# Altium PCB AT-kdFCU.PcbDoc (part 2 of 2)
Units mm, origin at the board's own origin, x right, y up, seen from the top; angles counter-clockwise.
Board outline 40 x 40 mm, 4 copper layers (Top Layer, GND, POWER, Bottom Layer), stack 0.603 mm thick; 137 components, 117 nets, 527 pads, 186 vias.
Unrouted connection lines stored in the file: 1.
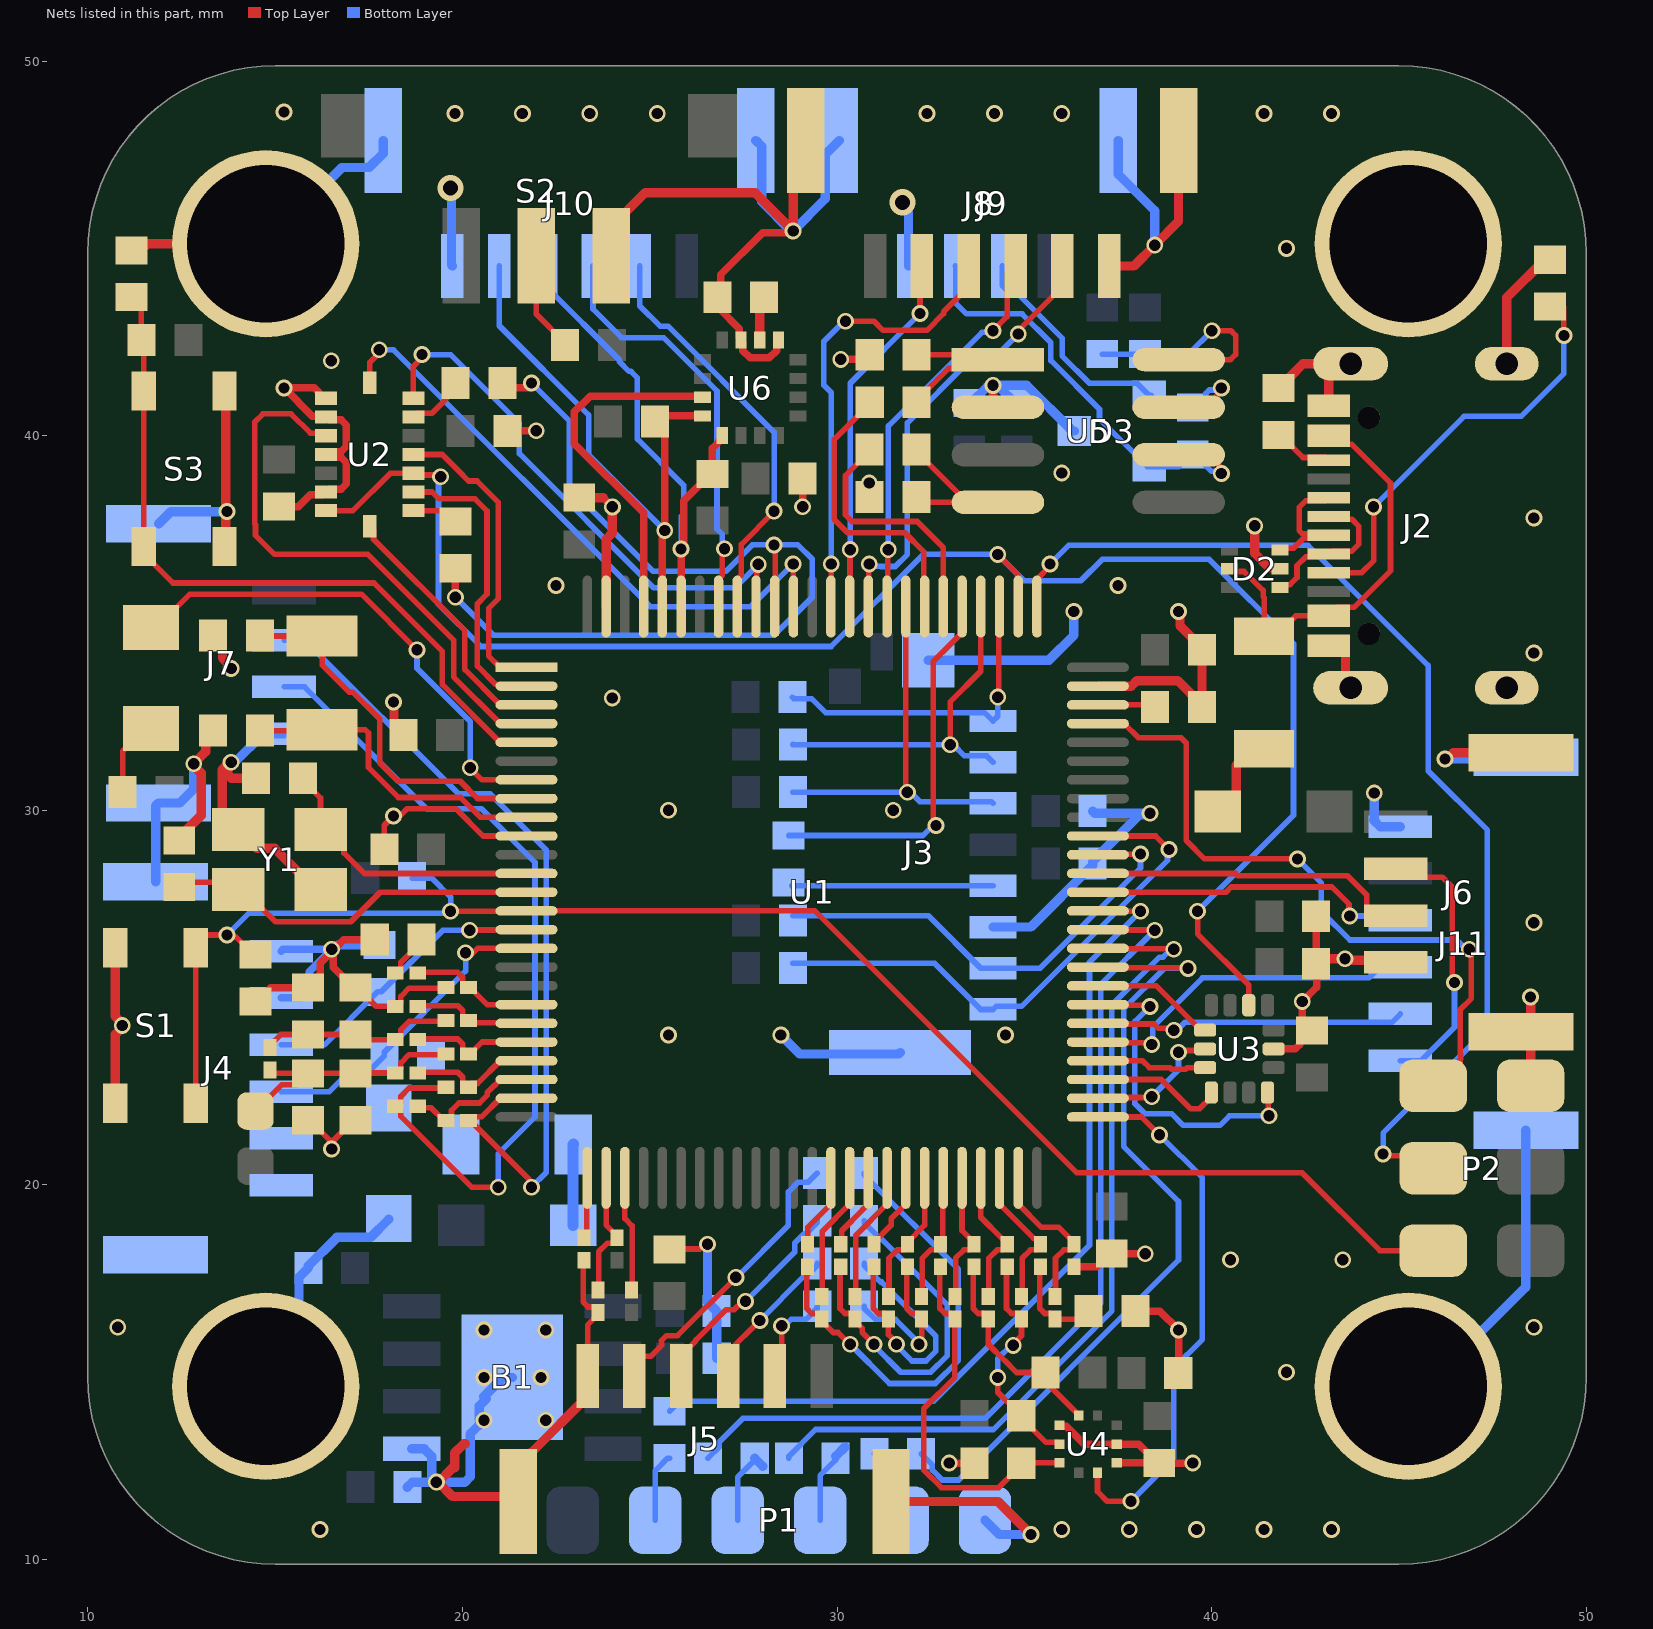
[diagram p4: the nets of this part, all layers, seen from the top]

## Via types
v1: diameter 0.45, hole 0.3, Top Layer to Bottom Layer, 180 vias
v2: diameter 0.7, hole 0.4, Top Layer to Bottom Layer, 6 vias

## Nets (pads, with @x,y where several pads share a name; then routed paths per layer and width w, separated by ;. In a path a pad name is that pad's centre, name@x,y a point inside that pad or via, vN(x,y) a via of type N, cw(c..) or ccw(c..) an arc to the next point about the centre after c; other vN are vias at no path point) (continued)
GND: B1.1 B1.9 C1.1 C2.1 C3.1 C4.1 C5.1 C6.1 C7.1 C8.1 C9.1 C10.1 C11.1 C12.1 C13.1 C14.2 C15.2 C16.1 C17.2 C18.2 C19.1 C20.1 C21.1 C22.1 C23.1 C24.1 C25.1 C26.2 C27.2 C28.1 C29.1 C30.1 C31.2 C32.1 C33.1 C34.1 C35.2 C36.2 C37.2 C38.2 C39.2 C40.1 D2.2 D3.3 D5.1 J2.A1_B12 J2.B1_A12 J2.S1 J2.S2 J2.S3 J2.S4 J3.6 J3.S1 J3.S2 J4.1 J4.2 J4.S1 J4.S2 J5.6 J5.S1 J5.S2 J6.4 J6.S1 J6.S2 J7.4 J7.S1 J7.S2 J8.4 J8.S1 J8.S2 J9.6 J9.S1 J9.S2 J10.6 J10.S1 J10.S2 J11.6 J11.S1 J11.S2 P1.1 P2.6 pad.2 R3.1 R4.1 R9.2 R40.1 R41.1 R50.1 R51.1 R72.1 S1.3 S1.4 S2.3 S3.3 S3.4 U1.10 U1.74 U1.99 U2.2 U2.4 U2.6 U2.7 U3.6 U4.3 U4.8 U4.9 U5.2 U6.9 U6.11 Y1.2 Y1.4 | length 205.7
  Top Layer w0.15: C3.1@15.88,21.725 15.93,21.725 16.453,21.203 16.453,21.012 v1(16.51,20.955) 16.567,21.012 16.567,21.193 17.1,21.725 C4.1@17.15,21.725 ; C6.1@17.15,25.265 17.2,25.265 17.7,24.765 R41.1@18.207,24.765 18.257,24.765 18.357,24.865 18.357,25.033 18.578,25.254 19.539,25.254 R40.1@19.558,25.273 ; C13.1@17.915,28.961 17.915,29.599 v1(18.161,29.845) ; v1@18.288,29.845 18.33,29.845 18.526,30.041 19.827,30.041 20.555,29.313 U1.10@21.712,29.313 ; R50.1@23.241,17.988 23.222,17.969 23.222,16.873 23.354,16.741 23.522,16.741 23.622,16.641 R51.1@23.622,16.591 23.622,16.541 23.341,16.26 J5.6@23.341,14.986 ; C10.1@25.532,18.28 25.541,18.288 26.335,18.288 26.462,18.415 v1(26.543,18.415)
  Top Layer w0.2: C16.1@14.473,24.9 14.523,24.9 14.887,25.265 C5.1@15.88,25.265 15.93,25.265 16.205,25.54 16.205,25.917 16.51,26.221 v1(16.51,26.289) ; C19.1@15.108,38.108 15.116,38.1 15.621,38.1 15.943,38.422 16.286,38.422 U2.2@16.361,38.497 16.436,38.572 16.76,38.572 16.906,38.718 16.906,39.276 16.76,39.422 16.436,39.422 U2.4@16.361,39.497 16.436,39.572 16.76,39.572 16.906,39.718 16.906,40.276 16.76,40.422 16.436,40.422 U2.6@16.361,40.497 16.336,40.522 15.993,40.522 v1(15.24,41.275) 16.049,41.275 16.166,41.158 16.166,41.072 16.241,40.997 U2.7@16.361,40.997 ; v1@16.558,26.241 16.558,25.807 17.1,25.265 C6.1@17.15,25.265 ; v1@16.578,26.289 16.837,26.548 C40.1@17.661,26.548 ; C25.1@21.201,40.127 21.206,40.132 v1(21.971,40.132) ; 23.757,38.346 v1(24.003,38.1) ; C32.1@26.551,43.693 26.551,43.643 26.826,43.368 26.876,43.368 27.386,42.859 27.386,42.6 U6.11@27.436,42.55 27.486,42.5 27.486,42.271 27.682,42.075 28.19,42.075 28.386,42.271 28.386,42.5 U6.9@28.436,42.55 ; C32.1@26.805,43.693 26.902,43.79 26.902,44.301 28.019,45.418 28.781,45.418 v1(28.829,45.466) ; C30.1@29.075,38.857 29.082,38.849 v1(29.082,38.101) ; v1(30.099,42.037) 30.751,42.037 C28.1@30.875,42.161 ; v1(32.996,12.573) 33.661,12.573 R9.2@33.667,12.568 ; U4.3@35.94,13.581 35.966,13.556 36.124,13.556 36.599,13.081 U4.9@37.466,13.081 38.053,13.081 38.553,12.581 C24.1@38.603,12.581 38.611,12.573 v1(39.497,12.573) ; R72.1@36.322,17.815 36.928,17.815 37.283,18.169 C9.1@37.333,18.169 37.341,18.161 v1(38.227,18.161) ; U4.8@37.466,12.581 C24.1@38.603,12.581 ; C2.1@37.965,16.632 38.613,16.632 v1(39.116,16.129) 39.116,14.989 C23.1@39.108,14.981 C23.1@39.108,14.727 ; U3.6@41.656,23.63 42.235,23.63 42.352,23.747 42.352,23.847 42.627,24.122 C21.1@42.677,24.122 42.418,24.381 v1(42.418,24.892) 42.799,25.273 42.799,25.894 C20.1@42.791,25.903 C22.1@42.791,27.173
  Top Layer w0.25: S1.4@10.736,22.182 10.736,24.017 10.922,24.203 v1(10.922,24.257) 10.922,24.311 10.736,24.497 S1.3@10.736,26.332 ; C31.2@11.425,44.946 11.601,45.123 pad.2@14.75,45.123 ; C14.2@12.441,29.325 12.491,29.325 13.025,29.859 13.025,30.996 12.827,31.193 v1(12.827,31.242) 13.15,31.565 13.15,31.929 C15.2@13.347,32.126 ; C18.2@13.347,34.666 13.597,34.416 13.597,34.066 13.827,33.836 v1(13.827,33.782) ; S3.3@13.648,37.041 13.682,37.075 13.682,37.939 v1(13.716,37.973) 13.682,38.007 13.682,41.157 S3.4@13.648,41.191 ; 13.74,31.037 13.74,30.944 13.828,30.856 C17.2@14.49,30.856 ; v1(13.827,31.28) 13.783,31.28 13.589,31.086 13.589,29.906 Y1.4@14.013,29.482 14.513,28.982 14.988,28.982 Y1.2@16.088,27.882 ; v1(18.161,32.893) 18.173,32.881 18.173,32.259 C7.1@18.423,32.009 ; v1(19.304,12.065) v1@19.358,12.065 ; 20.071,13.093 20.043,13.093 19.793,12.843 19.793,12.446 19.739,12.446 v1@19.358,12.065 ; C12.1@23.119,38.346 23.757,38.346 ; J5.6@23.341,14.9 23.341,14.35 21.866,12.875 21.866,12.107 21.443,11.684 19.739,11.684 v1@19.358,12.065 ; U1.99@23.837,35.438 23.837,37.232 24.003,37.398 v1(24.003,38.1) ; S2.3@23.971,44.8 23.971,45.575 24.878,46.482 27.813,46.482 v1(28.829,45.466) 28.829,47.542 J9.S2@29.166,47.879 ; v1(30.861,38.735) 30.861,38.368 C29.1@30.869,38.359 ; J5.S2@31.441,11.55 34.297,11.55 v1(35.179,10.668) ; v1(34.163,41.343) 34.163,40.89 U5.2@34.295,40.759 ; U1.74@36.963,33.313 37.856,33.313 38.004,33.461 39.093,33.461 C1.1@39.743,32.811 ; J9.6@37.266,44.529 37.925,44.529 v1(38.481,45.085) 39.116,45.72 J9.S1@39.116,47.879 ; v1(39.116,35.306) 39.154,35.268 39.154,34.923 39.743,34.335 C11.1@39.743,34.285 C1.1@39.743,32.811 ; C1.1@39.743,32.761 C1.1@39.743,32.811 ; v1(41.148,37.592) 41.148,36.86 41.534,36.474 41.798,36.474 D2.2@41.823,36.449 ; R4.1@41.788,41.267 41.838,41.267 42.088,41.517 42.088,41.567 42.439,41.917 J2.S2@43.429,41.917 ; C20.1@42.799,25.894 42.94,26.035 v1(43.561,26.035) 43.599,25.997 44.851,25.997 J6.4@44.91,25.938 ; J2.A1_B12@43.129,34.392 43.399,34.392 43.574,34.217 43.574,33.402 J2.S1@43.709,33.267 ; J2.B1_A12@43.129,40.792 43.129,41.617 J2.S2@43.429,41.917 ; J2.S2@43.709,41.917 J2.S2@43.429,41.917 ; pad.2@45.212,14.732 pad.2@45.287,14.807 ; v1(46.228,31.369) 46.282,31.369 46.451,31.538 J6.S2@48.26,31.538 ; J2.S4@47.879,41.917 47.879,43.688 R3.1@48.895,44.704 ; v1(48.514,25.019) 48.514,22.707 P2.6@48.574,22.647
  Bottom Layer w0.15: D5.1@18.034,19.084 D5.1@18.034,19.099 D5.1@18.034,19.114
  Bottom Layer w0.2: J4.2@15.161,24.989 15.711,24.989 15.911,25.189 15.911,25.69 v1(16.51,26.289) 15.211,26.289 J4.1@15.161,26.239
  Bottom Layer w0.25: J4.S2@11.811,28.089 11.811,30.115 J7.S1@11.89,30.194 12.452,30.194 12.827,30.569 v1(12.827,31.242) ; J7.S2@11.89,37.644 12.219,37.973 v1(13.716,37.973) ; v1(13.827,31.28) 13.926,31.28 14.69,32.044 J7.4@15.24,32.044 ; pad.2@14.75,14.623 15.637,15.51 15.637,17.535 C38.2@15.887,17.785 15.887,17.835 16.65,18.599 17.549,18.599 D5.1@18.034,19.084 ; pad.2@14.75,45.123 16.783,47.156 17.51,47.156 17.885,47.531 J10.S1@17.885,47.879 ; v1(16.51,26.289) 16.564,26.289 16.679,26.404 C35.2@17.785,26.404 ; C39.2@18.53,11.933 18.663,12.065 v1(19.304,12.065) ; B1.1@18.648,12.954 18.977,12.954 19.177,12.754 19.177,12.192 v1(19.304,12.065) ; v2(19.685,46.609) 19.71,46.584 19.71,44.554 J10.6@19.735,44.529 ; B1.9@20.447,13.716 20.447,14.097 B1.9@20.637,14.287 ; v1(20.574,13.716) 20.212,13.354 20.212,12.211 20.066,12.065 v1(19.304,12.065) ; B1.9@20.574,14.351 21.082,14.859 B1.9@21.336,14.859 ; v1(26.543,18.415) 26.543,16.874 C37.2@26.785,16.632 26.789,16.628 C8.1@26.789,15.372 ; J10.S2@27.835,47.879 27.99,47.724 27.99,46.25 28.775,45.466 v1(28.829,45.466) 29.684,46.321 29.684,47.506 J8.S1@30.057,47.879 ; v1(28.5,24) 29.005,23.495 31.645,23.495 J3.S1@31.683,23.533 ; v2(31.75,46.228) 31.75,46.106 31.907,45.949 J8.4@31.907,44.529 ; J3.S2@32.438,34.008 35.659,34.008 36.322,34.671 v1(36.322,35.306) ; C26.2@33.528,40.874 33.578,40.874 34.008,41.304 34.125,41.304 v1(34.163,41.343) ; P1.1@33.95,11.049 34.331,10.668 v1(35.179,10.668) ; J3.6@34.163,26.883 35.174,26.883 36.822,28.53 C34.1@36.822,28.58 36.822,28.63 38.072,29.881 38.316,29.881 v1(38.354,29.919) 36.88,29.919 C33.1@36.822,29.977 ; C27.2@34.798,40.874 34.748,40.874 34.318,41.304 34.201,41.304 v1(34.163,41.343) ; D3.3@36.333,40.124 36.283,40.124 35.064,41.343 v1(34.163,41.343) ; J8.S2@37.507,47.879 37.507,46.979 38.481,46.005 v1(38.481,45.085) ; v1(44.342,30.461) 44.342,29.738 44.323,29.738 44.498,29.563 J11.6@45.037,29.563 ; pad.2@45.212,14.732 45.847,14.732 48.387,17.272 J11.S2@48.387,21.463 ; v1(46.228,31.369) 48.343,31.369 J11.S1@48.387,31.413
  other v1: 16.2,10.8 36,10.8 37.8,10.8 39.6,10.8 41.4,10.8 43.2,10.8 22.225,13.716 20.574,14.859 22.098,14.859 42,15 20.574,16.129 22.225,16.129 10.8,16.2 48.6,16.2 40.5,18 43.5,18 25.5,24 34.5,24 48.6,27 25.5,30 31.5,30 24,33 48.6,34.2 22.5,36 37.5,36 48.6,37.8 36,39 16.5,42 42,45 19.8,48.6 21.6,48.6 23.4,48.6 25.2,48.6 32.4,48.6 34.2,48.6 36,48.6 41.4,48.6 43.2,48.6 15.24,48.641
NetC2_2: C2.2 R70.1 R71.1 | length 2.7
  Top Layer w0.15: R70.1@35.434,17.814 35.415,17.795 35.415,17.338 35.414,17.336 35.414,16.7 35.546,16.568 35.714,16.568 35.814,16.468 R71.1@35.814,16.418 36.501,16.418 C2.2@36.715,16.632
NetC3_2: C3.2 C4.2 FB1.2 R42.1 R45.1 R46.1 | length 6.9
  Top Layer w0.15: FB1.2@14.478,21.971 15.182,22.675 15.58,22.675 C3.2@15.88,22.975 ; R42.1@14.859,23.068 14.952,22.975 C3.2@15.88,22.975 ; R45.1@19.558,23.495 19.539,23.476 18.578,23.476 18.357,23.255 18.357,23.087 18.257,22.987 R46.1@18.207,22.987 17.162,22.987 C4.2@17.15,22.975 C3.2@15.88,22.975
NetC5_2: C5.2 C6.2 R42.2 R43.1 R44.1 | length 5.2
  Top Layer w0.15: R42.2@14.859,23.668 14.859,23.718 15.156,24.015 C5.2@15.88,24.015 C6.2@17.15,24.015 17.289,23.876 R44.1@18.207,23.876 18.257,23.876 18.357,23.976 18.357,24.144 18.578,24.365 19.539,24.365 R43.1@19.558,24.384
NetC28_2: C28.2 R13.2 U5.1 | length 4.9
  Top Layer w0.15: R13.2@32.125,40.891 32.125,40.941 32.976,41.793 34.059,41.793 U5.1@34.295,42.029 34.162,42.161 C28.2@32.125,42.161
NetC29_2: C29.2 R15.2 U5.4 | length 3.4
  Top Layer w0.15: C29.2@32.119,38.359 32.26,38.219 33.48,38.219 32.119,39.579 R15.2@32.119,39.629
NetC31_1: C31.1 R12.1 S3.1 S3.2 U1.5 | length 19.7
  Top Layer w0.15: C31.1@11.425,43.696 11.425,42.564 R12.1@11.438,42.55 11.498,42.491 S3.2@11.498,41.191 S3.1@11.498,37.041 11.498,36.841 12.271,36.068 17.639,36.068 19.466,34.241 19.466,33.357 21.01,31.813 U1.5@21.712,31.813
NetC32_2: C32.2 U6.10 | length 1.3
  Top Layer w0.25: C32.2@27.801,43.82 27.936,43.686 U6.10@27.936,42.55
NetC35_1: C35.1 J4.3 U1.15 | length 7.8
  Top Layer w0.15: v1(20.193,26.797) 20.201,26.805 21.704,26.805 U1.15@21.712,26.813
  Bottom Layer w0.15: J4.3@15.161,23.739 16.32,23.739 17.735,25.154 C35.1@17.785,25.154 17.835,25.154 19.478,26.797 v1(20.193,26.797)
NetC36_1: C36.1 J4.4 U1.16 | length 8.5
  Top Layer w0.15: v1@20.085,26.072 20.166,26.072 20.408,26.313 U1.16@21.712,26.313
  Bottom Layer w0.15: J4.4@15.161,22.489 16.45,22.489 17.101,23.14 17.615,23.14 17.915,23.44 C36.1@17.915,23.49 17.915,23.54 20.085,25.71 v1(20.085,26.199)
NetC40_2: C40.2 R39.1 | length 1.2
  Top Layer w0.15: R39.1@18.207,25.654 18.257,25.654 18.357,25.754 18.357,25.944 18.911,26.498 C40.2@18.911,26.548
NetD1_A: D1.A F1.2 | length 2.5
  Top Layer w0.25: D1.A@40.166,29.845 40.226,29.845 40.661,30.28 40.661,31.206 41.102,31.647 F1.2@41.402,31.647
NetD2_1: D2.1 J2.A7 J2.B7 | length 4.2
  Top Layer w0.15: D2.1@41.823,35.949 41.898,36.024 42.091,36.024 42.279,36.211 42.279,36.53 42.516,36.767 43.054,36.767 J2.B7@43.129,36.842 43.204,36.917 43.742,36.917 43.924,37.099 43.924,37.585 43.742,37.767 43.204,37.767 J2.A7@43.129,37.842
NetD2_3: D2.3 J2.A6 J2.B6 | length 3.8
  Top Layer w0.15: D2.3@41.823,36.949 41.87,36.996 42.189,36.996 42.46,37.267 43.054,37.267 J2.A6@43.129,37.342 43.094,37.377 42.425,37.377 42.334,37.468 42.334,38.085 42.516,38.267 43.054,38.267 J2.B6@43.129,38.342
NetD2_5: D2.5 F1.1 J2.A4_B9 J2.B4_A9 | length 10.9
  Top Layer w0.15: D2.5@40.6,36.449 40.675,36.374 40.868,36.374 41.373,35.869 41.373,35.706 41.402,35.677 F1.1@41.402,34.647 41.702,34.647 42.247,35.192 J2.A4_B9@43.129,35.192 43.354,35.417 43.8,35.417 44.773,36.39 44.773,38.736 43.742,39.767 43.354,39.767 J2.B4_A9@43.129,39.992
NetD3_1: D3.1 J8.2 R14.2 U5.7 | length 9.8
  Top Layer w0.15: U5.7@39.122,40.759 40.021,40.759 40.136,40.873 40.136,41.07 40.259,41.194 v1(40.259,41.275)
  Bottom Layer w0.15: J8.2@34.407,44.529 34.407,44.008 34.632,43.783 34.83,43.783 36.009,42.604 36.009,42.128 36.738,41.399 38.008,41.399 D3.1@38.333,41.074 38.383,41.074 38.709,40.747 39.547,40.747 39.847,41.047 39.847,41.13 39.935,41.218 40.202,41.218 v1(40.259,41.275)
NetD3_2: D3.2 J8.3 R14.1 U5.6 | length 12.1
  Top Layer w0.15: U5.6@39.122,39.489 39.918,39.489 40.202,39.205 40.202,39.046 v1(40.259,38.989)
  Bottom Layer w0.15: J8.3@33.157,44.529 33.166,44.52 33.166,43.542 33.459,43.249 34.94,43.249 35.709,42.48 35.709,42.003 37.008,40.704 37.008,40.449 38.283,39.174 39.124,39.174 39.447,39.497 R14.1@39.497,39.497 39.547,39.497 39.998,39.046 40.202,39.046 v1(40.259,38.989)
NetD4_A: D4.A F2.2 | length 2.2
  Bottom Layer w0.3: D4.A@22.953,18.923 22.953,21.072 F2.2@22.963,21.082
NetD5_2: D5.2 F2.1 J4.5 J4.6
NetDS1_1: DS1.1 R16.1 | length 2.1
  Top Layer w0.15: R16.1@10.93,30.485 10.93,31.574 11.534,32.178 DS1.1@11.684,32.178
NetDS1_2: DS1.2 U1.7 | length 13.5
  Top Layer w0.15: DS1.2@11.684,34.878 11.834,34.878 12.724,35.768 17.303,35.768 v1(18.788,34.282) ; v1(20.209,31.137) 20.209,31.131 20.527,30.813 U1.7@21.712,30.813
  Bottom Layer w0.15: v1(18.788,34.282) 18.788,33.791 20.209,32.37 v1(20.209,31.137)
NetJ2_A5: J2.A5 R3.2 | length 11.3
  Top Layer w0.15: J2.A5@43.129,36.342 44.008,36.342 44.323,36.657 v1(44.323,38.1) ; R3.2@49.264,43.566 49.403,43.428 v1(49.403,42.672)
  Bottom Layer w0.15: v1(44.323,38.1) 46.736,40.513 48.26,40.513 49.403,41.656 v1(49.403,42.672)
NetJ2_B5: J2.B5 R4.2 | length 1.6
  Top Layer w0.15: R4.2@41.788,40.017 41.838,40.017 42.438,39.417 43.054,39.417 J2.B5@43.129,39.342
NetJ3_1: J3.1 R19.1 U1.78 | length 8.7
  Top Layer w0.15: v1(34.29,33.02) 34.317,33.047 34.317,35.419 U1.78@34.337,35.438
  Bottom Layer w0.15: R19.1@28.809,33.02 28.847,32.982 29.321,32.982 29.695,32.608 33.938,32.608 J3.1@34.163,32.383 34.29,32.51 v1(34.29,33.02)
NetJ3_2: J3.2 R20.1 U1.79 | length 9.6
  Top Layer w0.15: v1(33.02,31.75) 33.02,32.893 33.837,33.71 U1.79@33.837,35.438
  Bottom Layer w0.15: R20.1@28.821,31.755 28.826,31.75 v1(33.02,31.75) 33.101,31.75 33.401,31.45 33.996,31.45 J3.2@34.163,31.283
NetJ3_3: J3.3 R21.1 U1.83 | length 10.4
  Top Layer w0.15: U1.83@31.837,35.438 31.837,30.52 v1(31.877,30.48)
  Bottom Layer w0.15: R21.1@28.821,30.485 31.872,30.485 v1(31.877,30.48) 31.958,30.48 32.212,30.226 34.12,30.226 J3.3@34.163,30.183
NetJ3_5: J3.5 R24.1 | length 5.4
  Bottom Layer w0.15: R24.1@28.792,27.983 J3.5@34.163,27.983
NetJ3_7: J3.7 R22.1 U1.65 | length 12.5
  Top Layer w0.15: U1.65@36.962,28.813 36.971,28.821 38.091,28.821 v1(38.099,28.83)
  Bottom Layer w0.15: R22.1@28.821,27.183 32.438,27.183 33.838,25.783 J3.7@34.163,25.783 35.423,25.783 38.099,28.459 v1(38.099,28.83)
NetJ3_8: J3.8 R23.1 U1.66 | length 14.5
  Top Layer w0.15: U1.66@36.962,29.313 38.505,29.313 v1(38.862,28.956)
  Bottom Layer w0.15: R23.1@28.821,25.913 32.608,25.913 33.838,24.683 J3.8@34.163,24.683 34.245,24.765 34.925,24.765 38.821,28.661 38.821,28.915 v1(38.862,28.956)
NetJ5_2: J5.2 R38.1 | length 2.5
  Top Layer w0.15: J5.2@28.341,14.986 28.522,15.167 v1(28.522,16.237)
  Bottom Layer w0.15: v1(28.522,16.237) 28.603,16.237 28.775,16.409 29.172,16.409 29.472,16.709 R38.1@29.472,16.759
NetJ5_3: J5.3 R37.1 | length 3.9
  Top Layer w0.15: J5.3@27.091,14.986 27.091,15.536 27.938,16.383 v1(27.94,16.383)
  Bottom Layer w0.15: v1(27.94,16.383) 29.109,17.552 29.172,17.552 29.472,17.852 R37.1@29.472,17.902
NetJ5_4: J5.4 R36.1 | length 5.8
  Top Layer w0.15: J5.4@25.841,14.986 25.841,15.45 26.232,15.841 26.232,15.859 27.04,16.667 27.254,16.667 27.478,16.891 v1(27.559,16.891)
  Bottom Layer w0.15: v1(27.559,16.891) 28.872,18.204 28.872,18.445 29.122,18.695 29.172,18.695 29.472,18.995 R36.1@29.472,19.045
NetJ5_5: J5.5 R35.1 | length 7.8
  Top Layer w0.15: J5.5@24.591,14.986 24.591,15.198 24.816,15.423 25.028,15.423 25.316,15.711 25.316,15.843 25.448,15.975 25.741,15.975 v1(27.298,17.533)
  Bottom Layer w0.15: v1(27.298,17.533) 27.312,17.533 28.702,18.923 28.702,19.812 28.96,20.07 29.228,20.07 R35.1@29.472,20.315
NetJ6_2: J6.2 J11.1 | length 7.3
  Top Layer w0.15: J6.2@44.91,28.438 45.135,28.213 46.163,28.213 46.425,27.952 46.425,25.457 v1(46.482,25.4)
  Bottom Layer w0.15: J11.1@45.037,23.313 45.587,23.313 46.482,24.208 v1(46.482,25.4)
NetJ6_3: J6.3 U1.64 | length 8.6
  Top Layer w0.15: U1.64@36.962,28.313 40.639,28.313 40.7,28.252 43.628,28.252 44.135,27.745 44.135,27.413 44.36,27.188 J6.3@44.91,27.188
NetJ7_2: J7.2 R49.1 U1.24 | length 22.8
  Top Layer w0.15: R49.1@20.158,21.717 R49.1@20.193,21.717 ; U1.24@21.712,22.313 21.01,22.313 20.514,21.817 20.293,21.817 R49.1@20.193,21.717 ; v1(21.844,19.939) 21.787,19.996 21.787,20.138 20.208,21.717 R49.1@20.193,21.717
  Bottom Layer w0.15: J7.2@15.24,34.544 15.79,34.544 19.894,30.44 20.741,30.44 22.238,28.943 22.238,20.333 v1(21.844,19.939)
NetJ7_3: J7.3 R47.1 R48.1 | length 23.1
  Top Layer w0.15: R48.1@18.207,22.098 R48.1@18.257,22.098 ; R47.1@19.558,22.606 19.539,22.587 18.578,22.587 18.357,22.366 18.357,22.198 R48.1@18.257,22.098 ; v1(20.955,19.939) 20.248,19.939 18.357,21.83 18.357,21.998 R48.1@18.257,22.098
  Bottom Layer w0.15: J7.3@15.24,33.294 15.79,33.294 19.043,30.041 20.505,30.041 21.938,28.608 21.938,21.811 20.955,20.828 v1(20.955,19.939)
NetJ9_2: J9.2 U1.86 | length 9.9
  Top Layer w0.15: U1.86@30.337,35.438 30.345,35.446 30.345,36.949 v1(30.353,36.957) ; v1(32.214,43.261) 32.214,44.477 J9.2@32.266,44.529
  Bottom Layer w0.15: v1(30.353,36.957) 30.353,41.4 v1(32.214,43.261)
NetJ9_3: J9.3 U1.87 | length 12.4
  Top Layer w0.15: U1.87@29.837,35.438 29.841,35.442 29.841,36.572 v1(29.845,36.576) ; v1(30.226,43.053) 30.988,43.053 31.23,42.811 32.4,42.811 32.846,43.256 32.846,43.309 33.516,43.979 J9.3@33.516,44.529
  Bottom Layer w0.15: v1(29.845,36.576) 29.845,41.148 29.649,41.344 29.649,42.521 30.181,43.053 v1(30.226,43.053)
NetJ9_4: J9.4 U1.84 | length 10.7
  Top Layer w0.15: U1.84@31.337,35.438 31.353,35.454 31.353,36.941 v1(31.369,36.957) ; v1(34.163,42.799) 34.541,43.177 34.541,44.304 J9.4@34.766,44.529
  Bottom Layer w0.15: v1(31.369,36.957) 31.369,40.257 33.869,42.757 34.121,42.757 v1(34.163,42.799)
NetJ9_5: J9.5 U1.85 | length 12.1
  Top Layer w0.15: U1.85@30.837,35.438 30.849,35.45 30.849,36.564 v1(30.861,36.576) ; v1(34.838,42.715) 34.895,42.772 34.895,42.858 36.016,43.979 J9.5@36.016,44.529
  Bottom Layer w0.15: v1(30.861,36.576) 30.918,36.519 31.171,36.519 31.183,36.507 31.555,36.507 31.877,36.829 31.877,40.341 33.536,42 34.123,42 v1(34.838,42.715)
NetJ10_2: J10.2 U1.92 | length 11.1
  Top Layer w0.15: U1.92@27.337,35.438 27.337,36.168 27.447,36.277 27.447,37.099 28.321,37.973 v1(28.321,37.984)
  Bottom Layer w0.15: J10.2@24.735,44.529 24.735,43.464 25.283,42.916 25.497,42.916 28.321,40.092 v1(28.321,37.984)
NetJ10_3: J10.3 U1.93 | length 11.3
  Top Layer w0.15: U1.93@26.837,35.438 26.837,36.168 26.939,36.27 26.939,36.923 v1(26.997,36.981)
  Bottom Layer w0.15: J10.3@23.485,44.529 23.485,43.379 24.248,42.616 25.372,42.616 26.797,41.191 26.797,37.506 26.939,37.363 26.939,37.038 v1(26.997,36.981)
NetJ10_4: J10.4 R11.1 U1.95 U6.1 | length 14.2
  Top Layer w0.2: v1(25.834,36.976) 25.837,36.972 U1.95@25.837,35.438 ; v1@25.908,36.957 25.908,38.263 26.625,38.981 R11.1@26.675,38.981 26.675,39.664 26.936,39.925 U6.1@26.936,40
  Bottom Layer w0.15: J10.4@22.235,44.529 22.235,43.979 24.188,42.026 24.188,41.978 24.452,41.714 24.5,41.714 24.671,41.543 24.671,39.91 25.908,38.673 25.908,37.902 25.85,37.844 25.85,36.992 v1(25.834,36.976)
NetJ10_5: J10.5 R10.1 U1.96 U6.16 | length 15.3
  Top Layer w0.2: U1.96@25.337,35.438 25.337,37.334 25.4,37.397 v1(25.4,37.465) 25.4,40.118 R10.1@25.138,40.381 25.282,40.525 U6.16@26.411,40.525
  Bottom Layer w0.15: J10.5@20.985,44.529 20.985,42.933 23.368,40.55 23.368,39.497 v1(25.4,37.465)
NetJ11_2: J11.2 U1.56 | length 8.3
  Top Layer w0.15: U1.56@36.962,24.313 36.982,24.293 38.465,24.293 38.573,24.186 38.933,24.186 v1(38.99,24.129)
  Bottom Layer w0.15: v1(38.99,24.129) 39.072,24.129 39.281,24.338 44.812,24.338 J11.2@45.037,24.563
NetJ11_3: J11.3 U1.55 | length 9.2
  Top Layer w0.15: U1.55@36.962,23.813 36.982,23.793 v1@38.4,23.793
  Bottom Layer w0.15: v1(38.4,23.749) 38.424,23.773 38.424,24.199 39.752,25.527 44.201,25.527 44.487,25.813 J11.3@45.037,25.813
NetJ11_4: J11.4 U1.63 | length 8.7
  Top Layer w0.15: U1.63@36.962,27.813 40.381,27.813 40.52,27.952 43.21,27.952 43.666,27.496 43.666,27.197 v1(43.685,27.178)
  Bottom Layer w0.15: v1(43.685,27.178) 44.922,27.178 J11.4@45.037,27.063
NetP1_2: P1.2 R29.1 | length 2.1
  Bottom Layer w0.15: R29.1@30.996,12.822 31.296,12.522 31.296,11.503 P1.2@31.75,11.049
NetP1_3: P1.3 R32.1 | length 2.2
  Bottom Layer w0.15: P1.3@29.55,11.049 29.55,12.242 29.964,12.655 R32.1@29.964,12.705 R32.1@29.964,12.755
  Bottom Layer w0.25: R32.1@29.964,12.755 R32.1@30.214,13.005
NetP1_4: P1.4 R33.1 | length 2.1
  Bottom Layer w0.15: P1.4@27.35,11.049 27.35,12.201 27.805,12.655 R33.1@27.805,12.705
  Bottom Layer w0.25: R33.1@27.805,12.705 R33.1@28.019,12.491
NetP1_5: P1.5 R34.1 | length 1.8
  Bottom Layer w0.15: P1.5@25.15,11.049 25.15,12.376 25.482,12.708 R34.1@25.532,12.708
NetR2_1: R2.1 S2.2 | length 2.7
  Top Layer w0.15: S2.2@21.971,44.8 21.971,43.244 22.741,42.473 R2.1@22.741,42.423
NetR5_1: R5.1 R66.1 R67.1 U4.2 | length 6
  Top Layer w0.15: R66.1@33.655,17.815 33.636,17.796 33.636,16.7 33.768,16.568 33.936,16.568 34.036,16.468 R67.1@34.036,16.418 34.036,15.747 34.474,15.309 34.476,15.309 34.794,14.991 35.318,14.991 36.453,13.856 U4.2@36.453,13.844 ; R5.1@35.568,14.991 R5.1@35.868,14.691
NetR6_1: R6.1 R68.1 R69.1 U4.4 | length 6.2
  Top Layer w0.15: v1(34.29,14.859) 34.29,14.464 34.567,14.188 34.617,14.188 34.917,13.888 34.917,13.788 35.578,13.126 35.895,13.126 U4.4@35.94,13.081 ; R68.1@34.544,17.815 34.525,17.796 34.525,16.7 34.657,16.568 34.825,16.568 34.925,16.468 R69.1@34.925,16.418 34.925,15.974 34.702,15.752 v1(34.702,15.717)
  Bottom Layer w0.15: v1(34.29,14.859) 34.29,15.367 34.64,15.717 v1(34.702,15.717)
NetR7_1: R7.1 U2.15 | length 1.1
  Top Layer w0.15: U2.15@18.691,37.997 19.788,37.997 R7.1@19.812,37.973
NetR7_2: R7.2 R8.2 U1.90 | length 25.7
  Top Layer w0.15: v1(28.321,37.084) 28.347,37.058 28.347,35.448 U1.90@28.337,35.438
  Top Layer w0.2: v1(19.812,35.687) 19.812,36.455 R7.2@19.817,36.461 ; R8.2@21.07,41.28 21.076,41.275 v1@21.844,41.275
  Bottom Layer w0.15: v1(19.812,35.687) 20.828,34.671 28.321,34.671 29.337,35.687 29.337,36.703 28.956,37.084 v1(28.321,37.084) 27.736,37.084 27.032,36.38 25.087,36.38 22.859,38.608 22.859,40.387 v1(21.844,41.402)
NetR8_1: R8.1 U2.10 | length 1.5
  Top Layer w0.15: U2.10@18.691,40.497 18.791,40.597 19.187,40.597 19.82,41.23 R8.1@19.82,41.28
NetR9_1: R9.1 R64.1 R65.1 U4.5 | length 10.2
  Top Layer w0.15: R64.1@32.766,17.815 32.747,17.796 32.747,16.7 32.879,16.568 33.047,16.568 33.147,16.468 R65.1@33.147,16.418 33.147,14.86 32.316,14.029 32.316,12.387 32.785,11.918 34.317,11.918 34.917,12.518 R9.1@34.917,12.568 34.93,12.581 U4.5@35.94,12.581
NetR13_1: R13.1 U1.82 | length 7.7
  Top Layer w0.15: R13.1@30.875,40.891 30.875,40.841 29.926,39.892 29.926,37.76 30.279,37.407 31.808,37.407 32.317,36.898 32.317,35.458 U1.82@32.337,35.438
NetR15_1: R15.1 U1.81 | length 6.6
  Top Layer w0.15: R15.1@30.869,39.629 30.869,39.579 30.226,38.936 30.226,37.884 30.401,37.709 32.141,37.709 32.837,37.013 U1.81@32.837,35.438
NetR17_2: R17.2 R18.2 U5.8 | length 6
  Top Layer w0.15: U5.8@39.122,42.029 40.505,42.029 40.64,42.164 40.64,42.672 40.513,42.799 v1(40.005,42.799)
  Bottom Layer w0.15: R18.2@37.079,42.176 R17.2@38.222,42.176 39.382,42.176 v1(40.005,42.799)
NetR24_2: R24.2 U1.80 | length 10.2
  Top Layer w0.15: v1(32.639,29.591) 32.639,29.672 32.57,29.741 32.57,33.97 33.337,34.737 U1.80@33.337,35.438
  Bottom Layer w0.15: R24.2@28.707,29.325 32.292,29.325 32.558,29.591 v1(32.639,29.591)
NetR29_2: R29.2 U1.59 | length 21.6
  Top Layer w0.15: U1.59@36.962,25.813 36.978,25.797 39.354,25.797 v1(39.37,25.781)
  Bottom Layer w0.15: R29.2@32.246,12.822 32.546,12.522 32.546,12.387 32.81,12.123 33.248,12.123 39.116,17.991 39.116,19.558 37.65,21.024 37.65,24.697 38.734,25.781 v1(39.37,25.781)
NetR32_2: R32.2 U1.60 | length 22.8
  Top Layer w0.15: U1.60@36.962,26.313 36.974,26.301 38.977,26.301 v1(38.989,26.289)
  Bottom Layer w0.15: R32.2@28.714,12.705 28.714,12.755 29.43,13.472 34.173,13.472 37.338,16.637 37.338,24.81 38.609,26.081 38.7,26.081 38.908,26.289 v1(38.989,26.289)
NetR33_2: R33.2 U1.61 | length 24.4
  Top Layer w0.15: U1.61@36.962,26.813 36.97,26.805 38.473,26.805 v1(38.481,26.797)
  Bottom Layer w0.15: R33.2@26.555,12.705 26.855,13.005 26.855,13.139 27.488,13.772 33.965,13.772 37.038,16.845 37.038,25.354 v1(38.481,26.797)
NetR34_2: R34.2 U1.62 | length 23.7
  Top Layer w0.15: U1.62@36.962,27.313 36.967,27.309 38.096,27.309 v1(38.101,27.304)
  Bottom Layer w0.15: R34.2@25.532,13.958 25.798,14.224 32.573,14.224 36.738,18.389 36.738,25.943 v1(38.101,27.304) v1(38.101,27.304)
NetR35_2: R35.2 R55.1 R57.1 | length 12.4
  Top Layer w0.15: R55.1@29.21,17.815 29.191,17.796 29.191,16.7 29.323,16.568 29.491,16.568 29.591,16.468 R57.1@29.591,16.418 29.591,16.368 29.898,16.061 30.03,16.061 30.343,15.747 v1(30.352,15.747)
  Bottom Layer w0.15: v1(30.352,15.747) 31.402,14.698 32.623,14.698 33.238,15.313 33.238,17.749 30.722,20.265 R35.2@30.722,20.315
NetR36_2: R36.2 R58.1 R59.1 | length 9.6
  Top Layer w0.15: R58.1@30.099,17.815 30.08,17.796 30.08,16.7 30.212,16.568 30.38,16.568 30.48,16.468 R59.1@30.48,16.418 30.48,16.368 30.67,16.178 30.67,16.066 v1(30.988,15.748)
  Bottom Layer w0.15: R36.2@30.722,19.045 30.722,18.995 31.165,18.552 31.191,18.552 32.938,16.804 32.938,15.437 32.499,14.998 31.702,14.998 30.988,15.712 v1(30.988,15.748)
NetR37_2: R37.2 R60.1 R61.1 | length 6.9
  Top Layer w0.15: R60.1@30.988,17.815 30.969,17.796 30.969,16.7 31.101,16.568 31.269,16.568 31.369,16.468 R61.1@31.369,16.418 31.369,16.003 31.588,15.784 v1(31.588,15.748)
  Bottom Layer w0.15: R37.2@30.722,17.902 30.722,17.852 31.165,17.409 31.191,17.409 32.638,15.961 32.638,15.562 32.374,15.298 32.002,15.298 31.588,15.712 v1(31.588,15.748)
NetR38_2: R38.2 R62.1 R63.1 | length 4.3
  Top Layer w0.15: R62.1@31.877,17.815 31.858,17.796 31.858,16.7 31.99,16.568 32.158,16.568 32.258,16.468 R63.1@32.258,16.418 32.258,15.899 32.188,15.829 v1(32.188,15.748)
  Bottom Layer w0.15: R38.2@30.722,16.759 30.722,16.709 31.022,16.409 31.564,16.409 32.188,15.784 v1(32.188,15.748)
NetR39_2: R39.2 R40.2 U1.19 | length 3.4
  Top Layer w0.15: R39.2@18.807,25.654 18.826,25.673 19.876,25.673 20.008,25.541 20.008,25.373 20.108,25.273 R40.2@20.158,25.273 20.208,25.273 20.308,25.173 20.308,25.164 20.659,24.813 U1.19@21.712,24.813
NetR41_2: R41.2 R43.2 U1.20 | length 3.2
  Top Layer w0.15: R41.2@18.807,24.765 18.826,24.784 19.876,24.784 20.008,24.652 20.008,24.484 20.108,24.384 R43.2@20.158,24.384 20.209,24.333 21.692,24.333 U1.20@21.712,24.313
NetR44_2: R44.2 R45.2 U1.21 | length 3.3
  Top Layer w0.15: R44.2@18.807,23.876 18.826,23.895 19.876,23.895 20.008,23.763 20.008,23.595 20.108,23.495 R45.2@20.158,23.495 20.208,23.495 20.526,23.813 U1.21@21.712,23.813
NetR46_2: R46.2 R47.2 U1.22 | length 3.5
  Top Layer w0.15: R46.2@18.807,22.987 18.826,23.006 19.876,23.006 20.008,22.874 20.008,22.706 20.108,22.606 R47.2@20.158,22.606 20.258,22.706 20.403,22.706 21.01,23.313 U1.22@21.712,23.313
NetR48_2: R48.2 R49.2 U1.23 | length 3.7
  Top Layer w0.15: R48.2@18.807,22.098 18.849,22.056 19.169,22.056 19.508,21.717 19.608,21.717 19.708,21.817 19.708,21.985 19.91,22.187 20.457,22.187 20.659,22.389 20.659,22.458 20.865,22.664 20.871,22.664 21.02,22.813 U1.23@21.712,22.813
NetR50_2: R50.2 U1.26 | length 1.6
  Top Layer w0.15: R50.2@23.241,18.588 23.317,18.664 23.317,20.168 U1.26@23.337,20.188
NetR51_2: R51.2 R52.2 U1.27 | length 3.4
  Top Layer w0.15: R51.2@23.622,17.191 23.641,17.21 23.641,18.217 23.862,18.438 24.03,18.438 24.13,18.538 R52.2@24.13,18.588 24.13,18.638 23.837,18.931 U1.27@23.837,20.188
NetR53_2: R53.2 U1.28 | length 3.1
  Top Layer w0.15: U1.28@24.337,20.188 24.337,19.099 24.53,18.906 24.53,17.21 R53.2@24.511,17.191
NetR55_2: R55.2 U1.39 | length 2
  Top Layer w0.15: R55.2@29.21,18.415 29.216,18.421 29.216,18.865 29.837,19.486 U1.39@29.837,20.188
NetR57_2: R57.2 U1.40 | length 3.5
  Top Layer w0.15: R57.2@29.591,17.018 29.61,17.037 29.61,18.762 30.337,19.489 U1.40@30.337,20.188
NetR58_2: R58.2 U1.41 | length 2.1
  Top Layer w0.15: R58.2@30.099,18.415 30.125,18.441 30.125,18.777 30.688,19.341 30.688,19.347 30.837,19.496 U1.41@30.837,20.188
NetR59_2: R59.2 U1.42 | length 3.5
  Top Layer w0.15: R59.2@30.48,17.018 30.499,17.037 30.499,18.648 31.337,19.486 U1.42@31.337,20.188
NetR60_2: R60.2 U1.43 | length 2.1
  Top Layer w0.15: R60.2@30.988,18.415 30.988,18.465 31.446,18.923 31.446,19.095 31.804,19.453 31.804,20.154 U1.43@31.837,20.188
NetR61_2: R61.2 R62.2 U1.44 | length 3.7
  Top Layer w0.15: R61.2@31.369,17.018 31.388,17.037 31.388,18.044 31.609,18.265 31.777,18.265 31.877,18.365 R62.2@31.877,18.415 31.877,18.465 32.337,18.925 U1.44@32.337,20.188
NetR63_2: R63.2 R64.2 U1.45 | length 3.5
  Top Layer w0.15: R63.2@32.258,17.018 32.277,17.037 32.277,18.044 32.498,18.265 32.666,18.265 32.766,18.365 R64.2@32.766,18.415 32.817,18.466 32.817,20.168 U1.45@32.837,20.188
NetR65_2: R65.2 R66.2 U1.46 | length 3.6
  Top Layer w0.15: R65.2@33.147,17.018 33.166,17.037 33.166,18.044 33.387,18.265 33.555,18.265 33.655,18.365 R66.2@33.655,18.415 33.655,18.465 33.337,18.783 U1.46@33.337,20.188
NetR67_2: R67.2 R68.2 U1.47 | length 3.8
  Top Layer w0.15: U1.47@33.837,20.188 33.837,19.135 34.407,18.565 34.444,18.565 34.544,18.465 R68.2@34.544,18.415 34.544,18.365 34.444,18.265 34.276,18.265 34.055,18.044 34.055,17.037 R67.2@34.036,17.018
NetR69_2: R69.2 R70.2 U1.48 | length 4
  Top Layer w0.15: U1.48@34.337,20.188 34.337,19.486 35.258,18.565 35.333,18.565 35.433,18.465 R70.2@35.433,18.415 35.433,18.365 35.333,18.265 35.165,18.265 34.944,18.044 34.944,17.037 R69.2@34.925,17.018
NetR71_2: R71.2 R72.2 U1.49 | length 4.4
  Top Layer w0.15: U1.49@34.837,20.188 34.837,19.486 35.458,18.865 35.922,18.865 36.322,18.465 36.322,18.365 36.222,18.265 36.054,18.265 35.833,18.044 35.833,17.497 35.832,17.495 35.832,17.038 R71.2@35.813,17.019
NetU1_1: U1.1 U2.12 | length 8.1
  Top Layer w0.15: U2.12@18.691,39.497 19.463,39.497 19.889,39.071 19.889,39.069 20.167,38.79 20.392,38.79 20.955,38.227 20.955,35.644 20.701,35.39 20.701,34.122 21.01,33.813 U1.1@21.712,33.813
NetU1_2: U1.2 U2.14 | length 8
  Top Layer w0.15: U2.14@18.691,38.497 19.19,38.497 19.376,38.311 20.335,38.311 20.655,37.991 20.655,35.768 20.401,35.514 20.401,33.851 20.888,33.364 20.931,33.364 20.982,33.313 U1.2@21.712,33.313
NetU1_3: U1.3 U2.16 | length 6.9
  Top Layer w0.15: U2.16@17.526,37.582 17.626,37.482 17.626,37.235 20.066,34.795 20.066,33.757 21.01,32.813 U1.3@21.712,32.813
NetU1_4: U1.4 U2.5 | length 15.2
  Top Layer w0.15: U2.5@16.361,39.997 16.292,40.066 15.941,40.066 15.425,40.582 14.674,40.582 14.458,40.366 14.458,37.64 14.478,37.62 14.478,37.337 14.985,36.83 17.477,36.83 19.766,34.541 19.766,33.557 21.01,32.313 U1.4@21.712,32.313
NetU1_51: U1.51 U4.7 | length 14.4
  Top Layer w0.15: U4.7@36.953,12.318 36.953,11.815 37.211,11.557 v1(37.846,11.557) ; U1.51@36.962,21.813 38.131,21.813 v1(38.608,21.336)
  Bottom Layer w0.15: v1(37.846,11.557) 38.989,12.7 38.989,15.113 39.751,15.875 39.751,20.193 v1(38.608,21.336)
NetU1_52: U1.52 U3.13 | length 3.7
  Top Layer w0.15: U1.52@36.962,22.313 36.982,22.333 38.38,22.333 v1(38.4,22.352) ; v1(39.116,23.542) 39.16,23.586 39.782,23.586 U3.13@39.826,23.63
  Bottom Layer w0.15: v1(38.4,22.352) 39.116,23.068 v1(39.116,23.542)
NetU1_53: U1.53 U3.1 | length 3.6
  Top Layer w0.15: U1.53@36.962,22.813 38.655,22.813 39.435,22.033 39.679,22.033 39.991,22.345 U3.1@39.991,22.465
NetU1_54: U1.54 U3.14 | length 3
  Top Layer w0.15: U1.54@36.962,23.313 38.154,23.313 38.337,23.13 38.892,23.13 38.93,23.092 39.302,23.092 39.34,23.13 U3.14@39.826,23.13
NetU1_57: U1.57 U3.4 | length 8.7
  Top Layer w0.15: U1.57@36.962,24.813 36.982,24.793 38.326,24.793 v1(38.354,24.765) ; U3.4@41.491,22.465 41.51,22.446 41.51,21.863 v1(41.529,21.844)
  Bottom Layer w0.15: v1(38.354,24.765) 37.95,24.361 37.95,22.166 38.214,21.902 38.931,21.902 39.243,21.59 40.218,21.59 40.472,21.844 v1(41.529,21.844)
NetU1_58: U1.58 U3.12 | length 3.4
  Top Layer w0.15: U1.58@36.962,25.313 38.523,25.313 39.706,24.13 U3.12@39.826,24.13
NetU1_77: U1.77 U2.1 U2.13 U3.9 | length 45.6
  Top Layer w0.15: U2.1@16.361,37.997 17.076,37.997 18.076,38.997 U2.13@18.691,38.997 18.737,38.951 19.373,38.951 v1(19.419,38.904) ; v1(34.29,36.83) 34.817,36.303 34.817,35.458 U1.77@34.837,35.438 ; v1(39.624,27.305) 39.624,26.701 40.991,25.334 U3.9@40.991,24.795
  Bottom Layer w0.15: v1(19.419,38.904) 19.362,38.847 19.362,35.501 20.492,34.371 29.844,34.371 32.303,36.83 v1(34.29,36.83) 34.994,36.126 36.507,36.126 37.079,36.698 39.937,36.698 42.186,34.45 42.186,29.867 v1(39.624,27.305)
NetU1_89: U1.89 U2.8 | length 16.5
  Top Layer w0.15: U2.8@17.526,41.412 17.526,41.956 17.78,42.21 v1(17.78,42.291) ; v1(28.828,36.575) 28.833,36.571 28.833,35.443 U1.89@28.837,35.438
  Bottom Layer w0.15: v1(17.78,42.291) 18.161,42.291 25.019,35.433 27.686,35.433 v1(28.828,36.575)
NetU1_91: U1.91 U2.9 | length 14.7
  Top Layer w0.15: U2.9@18.691,40.997 18.691,41.851 18.924,42.084 v1(18.924,42.165) ; U1.91@27.837,35.438 27.857,35.458 27.857,36.524 v1(27.897,36.564)
  Bottom Layer w0.15: v1@18.924,42.164 19.685,42.164 21.521,40.328 21.521,39.521 25.101,35.941 27.274,35.941 v1(27.897,36.564)
NetU1_97: U1.97 U6.15 | length 9.6
  Top Layer w0.2: U1.97@24.837,35.438 24.837,37.938 22.987,39.788 22.987,40.634 23.409,41.056 26.38,41.056 U6.15@26.411,41.025
OSC32In: C18.1 U1.8 Y2.1 | length 10.1
  Top Layer w0.15: C18.1@14.597,34.666 14.611,34.651 Y2.1@16.256,34.651 16.256,33.876 16.978,33.154 17.071,33.154 17.792,32.433 17.792,31.268 18.285,30.775 19.941,30.775 20.403,30.313 U1.8@21.712,30.313
OSC32Out: C15.1 U1.9 Y2.2 | length 8.6
  Top Layer w0.15: C15.1@14.597,32.126 16.231,32.126 Y2.2@16.256,32.151 17.404,32.151 17.492,32.063 17.492,31.144 18.295,30.341 19.951,30.341 20.479,29.813 U1.9@21.712,29.813
OSCIn: C17.1 U1.12 Y1.3 | length 7.6
  Top Layer w0.15: C17.1@15.74,30.856 15.74,30.806 16.213,30.332 Y1.3@16.213,29.482 16.338,29.482 16.838,28.982 16.838,28.857 17.384,28.311 19.761,28.311 19.762,28.313 U1.12@21.712,28.313
OSCOut: C14.1 U1.13 Y1.1 | length 10
  Top Layer w0.15: C14.1@12.441,28.075 13.82,28.075 Y1.1@14.013,27.882 14.513,27.382 14.655,27.382 15.013,27.024 17.019,27.024 17.808,27.813 U1.13@21.712,27.813
RST: C16.2 P2.1 R1.2 S1.1 S1.2 U1.14 | length 43.8
  Top Layer w0.15: S1.2@12.886,22.182 S1.1@12.886,26.332 12.886,26.42 13.136,26.67 v1(13.716,26.67) ; 13.961,26.613 14.423,26.15 C16.2@14.473,26.15 ; v1(19.685,27.305) 19.689,27.309 21.708,27.309 U1.14@21.712,27.313 29.41,27.313 36.403,20.32 42.418,20.32 44.491,18.247 P2.1@45.974,18.247
  Bottom Layer w0.15: v1(13.716,26.67) 14.294,27.248 19.628,27.248 v1(19.685,27.305) 19.685,27.686 19.182,28.189 R1.2@18.657,28.189
SWCLK: P2.3 U1.72 | length 18.5
  Top Layer w0.15: U1.72@36.962,32.313 37.664,32.313 38.042,31.934 39.186,31.934 39.321,31.799 39.321,29.192 39.811,28.702 v1(42.291,28.702) ; P2.3@45.974,22.647 46.025,22.647 46.629,23.251 46.629,23.343 46.646,23.36 46.646,23.484 46.635,23.495 46.635,24.681 46.932,24.978 46.932,26.232 v1(46.875,26.289)
  Bottom Layer w0.15: v1(42.291,28.702) 42.924,28.069 42.924,27.303 43.689,26.538 46.477,26.538 46.482,26.543 46.539,26.543 46.793,26.289 v1(46.875,26.289)
SWDIO: P2.2 U1.76 | length 29.3
  Top Layer w0.15: U1.76@35.337,35.438 35.337,36.168 35.687,36.518 v1(35.687,36.576) ; v1(44.577,20.828) 44.63,20.775 45.646,20.775 P2.2@45.974,20.447
  Bottom Layer w0.15: v1(35.687,36.576) 36.183,37.072 42.571,37.072 45.778,33.865 45.778,31.056 47.359,29.475 47.359,24.167 44.577,21.385 v1(44.577,20.828)
VCap2: C1.2 U1.73 | length 1.6
  Top Layer w0.15: U1.73@36.962,32.813 38.44,32.813 C1.2@38.493,32.761
pads on no net: B1.8 J2. J2.A8 J2.B8 J3.DET_1 J3.DET_2 S2.M U1.17 U1.18 U1.25 U1.29 U1.30 U1.31 U1.32 U1.33 U1.34 U1.35 U1.36 U1.37 U1.38 U1.67 U1.68 U1.69 U1.88 U1.98 U3.2 U3.3 U3.7 U3.10 U3.11 U5.5 U6.3 U6.5 U6.6 U6.7 U6.8 U6.12 U6.14
copper on no net: | length 151.4
  Top Layer w0.254: 10,14.873 ccw(c15,14.873) 15,9.873 45,9.873 ccw(c45,14.873) 50,14.873 50,44.873 ccw(c45,44.873) 45,49.873 15,49.873 ccw(c15,44.873) 10,44.873 10,14.873

## Polygon pours and split planes (outlines as drawn)
GND on Bottom Layer "GND_L04_P021" (solid, pour order 21): 37.432,49.624 45.027,49.624 cw(c45.027,44.874) 49.776,44.874 49.776,15.08 cw(c44.9,15.08) 44.9,10.203 15.359,10.203 cw(c15.359,15.207) 10.356,15.207 10.356,44.747 cw(c15.232,44.747) 15.232,49.624
"3.3 V" on Bottom Layer "3.3_V_L04_P000" (solid, pour order 0): 23.114,13.716 24.892,13.716 24.892,14.605 25.146,14.859 26.035,14.859 26.035,17.145 23.114,17.145 25.908,17.145 23.114,17.145
NetD5_2 on Bottom Layer "NETD5_2_L04_P005" (solid, pour order 5): 14.224,21.59 14.224,19.685 14.351,19.558 16.002,19.558 16.129,19.685 16.129,21.082 16.341,21.336 18.923,21.336 19.431,20.828 19.431,20.32 19.558,20.193 20.447,20.193 20.574,20.32 20.574,21.844 20.447,21.971 19.431,21.971 18.669,22.733 17.399,22.733 17.272,21.844
5V on Bottom Layer "5V_L04_P002" (solid, pour order 2): 17.788,13.716 19.431,13.716 19.431,17.145 20.828,18.161 20.828,19.431 20.701,19.558 19.304,19.558 19.177,19.431 19.177,18.034 17.78,17.272 17.78,13.724
GND on Top Layer "GND_L01_P010" (solid, pour order 10): 37.432,49.624 45.027,49.624 cw(c45.027,44.874) 49.776,44.874 49.776,15.08 cw(c44.9,15.08) 44.9,10.203 15.359,10.203 cw(c15.359,15.207) 10.356,15.207 10.356,44.747 cw(c15.232,44.747) 15.232,49.624
"3.3 V" on POWER (split plane): 45.294,49.355 45.586,49.326 45.876,49.279 46.163,49.212 46.444,49.126 46.719,49.023 46.987,48.902 47.246,48.763 47.496,48.608 47.734,48.437 47.962,48.25 48.176,48.049 48.377,47.835 48.564,47.607 48.735,47.369 48.89,47.119 49.029,46.86 49.15,46.592 49.253,46.317 49.339,46.036 49.406,45.749 49.453,45.459 49.482,45.167 49.491,44.891 49.49,44.873 49.49,14.873 49.491,14.855 49.482,14.579 49.453,14.287 49.406,13.997 49.339,13.71 49.253,13.429 49.15,13.154 49.029,12.886 48.89,12.627 48.735,12.377 48.564,12.139 48.377,11.911 48.176,11.697 47.962,11.496 47.734,11.309 47.496,11.138 47.246,10.983 46.987,10.844 46.719,10.723 46.444,10.62 46.163,10.534 45.876,10.467 45.586,10.42 45.294,10.391 45.018,10.382 45,10.383 15,10.383 14.982,10.382 14.706,10.391 14.414,10.42 14.124,10.467 13.837,10.534 13.556,10.62 13.281,10.723 13.013,10.844 12.754,10.983 12.504,11.138 12.266,11.309 12.038,11.496 11.824,11.697 11.623,11.911 11.436,12.139 11.265,12.377 11.11,12.627 10.971,12.886 10.85,13.154 10.747,13.429 10.661,13.71 10.594,13.997 10.547,14.287 10.518,14.579 10.509,14.855 10.51,14.873 10.51,44.873 10.509,44.891 10.518,45.167 10.547,45.459 10.594,45.749 10.661,46.036 10.747,46.317 10.85,46.592 10.971,46.86 11.11,47.119 11.265,47.369 11.436,47.607 11.623,47.835 11.824,48.049 12.038,48.25 12.266,48.437 12.504,48.608 12.754,48.763 13.013,48.902 13.281,49.023 13.556,49.126 13.837,49.212 14.124,49.279 14.414,49.326 14.706,49.355 14.982,49.364 15,49.363 45,49.363 45.018,49.364
GND on GND (split plane): 45.294,49.355 45.586,49.326 45.876,49.279 46.163,49.212 46.444,49.126 46.719,49.023 46.987,48.902 47.246,48.763 47.496,48.608 47.734,48.437 47.962,48.25 48.176,48.049 48.377,47.835 48.564,47.607 48.735,47.369 48.89,47.119 49.029,46.86 49.15,46.592 49.253,46.317 49.339,46.036 49.406,45.749 49.453,45.459 49.482,45.167 49.491,44.891 49.49,44.873 49.49,14.873 49.491,14.855 49.482,14.579 49.453,14.287 49.406,13.997 49.339,13.71 49.253,13.429 49.15,13.154 49.029,12.886 48.89,12.627 48.735,12.377 48.564,12.139 48.377,11.911 48.176,11.697 47.962,11.496 47.734,11.309 47.496,11.138 47.246,10.983 46.987,10.844 46.719,10.723 46.444,10.62 46.163,10.534 45.876,10.467 45.586,10.42 45.294,10.391 45.018,10.382 45,10.383 15,10.383 14.982,10.382 14.706,10.391 14.414,10.42 14.124,10.467 13.837,10.534 13.556,10.62 13.281,10.723 13.013,10.844 12.754,10.983 12.504,11.138 12.266,11.309 12.038,11.496 11.824,11.697 11.623,11.911 11.436,12.139 11.265,12.377 11.11,12.627 10.971,12.886 10.85,13.154 10.747,13.429 10.661,13.71 10.594,13.997 10.547,14.287 10.518,14.579 10.509,14.855 10.51,14.873 10.51,44.873 10.509,44.891 10.518,45.167 10.547,45.459 10.594,45.749 10.661,46.036 10.747,46.317 10.85,46.592 10.971,46.86 11.11,47.119 11.265,47.369 11.436,47.607 11.623,47.835 11.824,48.049 12.038,48.25 12.266,48.437 12.504,48.608 12.754,48.763 13.013,48.902 13.281,49.023 13.556,49.126 13.837,49.212 14.124,49.279 14.414,49.326 14.706,49.355 14.982,49.364 15,49.363 45,49.363 45.018,49.364

## Silkscreen, mask and mechanical layers (free items; w line width, h text height)
Top Overlay:
  text "TLM" at 40.767,45.847 h0.7 r90
  text "BOOT" at 24.765,44.323 h0.7
  text "SFTY" at 13.081,35.687 h0.7
  text "CAM" at 43.942,25.4 h0.7 r270
  text "CLK" at 43.053,21.971 h0.7
  text "GND" at 47.371,21.209 h0.7
  text "RST" at 11.049,20.447 h0.7
  text "DIO" at 43.18,19.812 h0.7
  text "3V3" at 47.371,19.05 h0.7
  text "RST" at 43.18,17.907 h0.7
  text "BOOT" at 46.99,16.637 h0.7
  text "PWM" at 20.32,10.414 h0.7 r90
Bottom Overlay:
  text "GPS-MAGN" at 25.208,42.538 h0.7
  text "CAN" at 35.052,42.545 h0.7
  text "RC" at 17.229,35.009 h0.7 r90
  text "POWER" at 17.018,25.527 h0.7 r90
  text "VTX" at 43.18,24.003 h0.7 r270
  text "4" at 26.543,10.541 h0.8
  text "3" at 28.702,10.541 h0.8
  text "2" at 30.988,10.541 h0.8
  text "1" at 33.02,10.541 h0.8
  text "5V" at 20.955,10.287 h1 r270
  text "GND" at 35.052,10.287 h1 r270
Mechanical 1:
  lines w0.254: 14.75,14.75 45.25,14.75 45.25,45.25 14.75,45.25 14.75,14.75

## Text inside footprints (layer, text, board x,y; h text height)
J2: Top 3D Body "PCB EDGE" at 49.779,42.792 h0.61 r90